# Altium PCB main_ADC_PCB.PcbDoc (part 5 of 8)
Units mm, origin at the board's own origin, x right, y up, seen from the top; angles counter-clockwise.
Board outline 150 x 100 mm, 4 copper layers (Top Layer, Layer 1, Layer 2, Bottom Layer), stack 1.62 mm thick; 535 components, 354 nets, 1725 pads, 1075 vias.
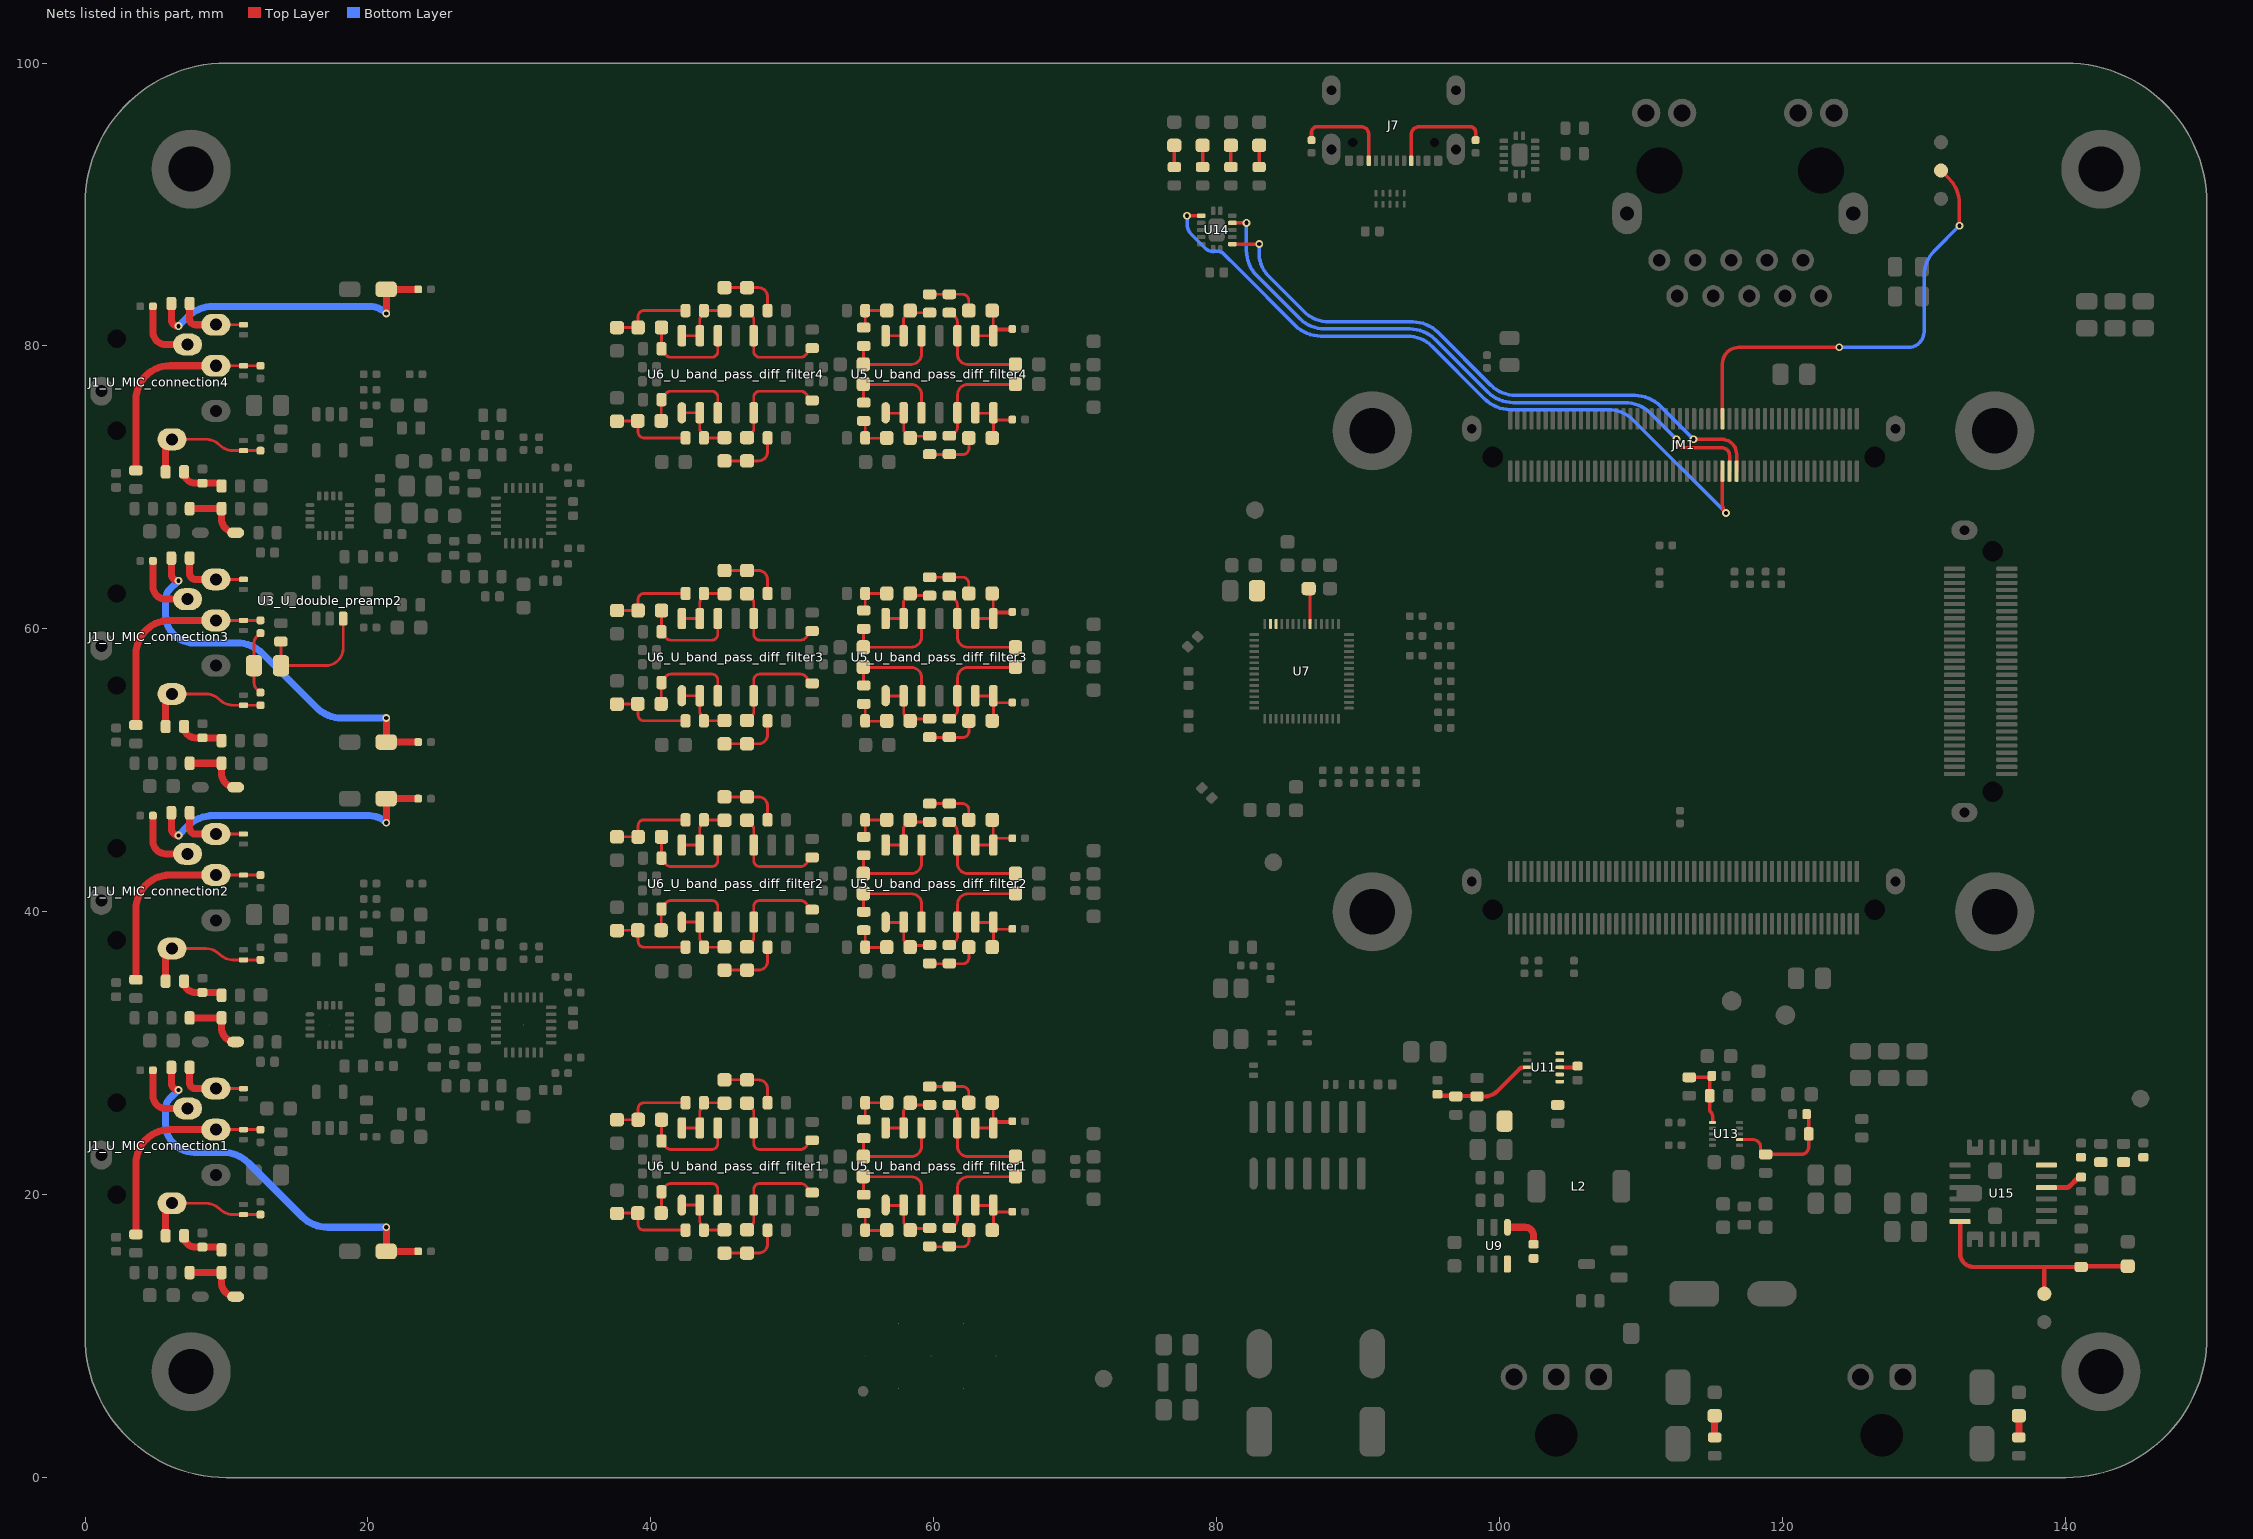
[diagram p7: the nets of this part, all layers, seen from the top]

## Via types
v1: diameter 0.55, hole 0.3, Top Layer to Bottom Layer, tented both sides, 1011 vias
v2: diameter 1, hole 0.6, Top Layer to Bottom Layer, 64 vias

## Nets (pads, with @x,y where several pads share a name; then routed paths per layer and width w, separated by ;. In a path a pad name is that pad's centre, name@x,y a point inside that pad or via, vN(x,y) a via of type N, cw(c..) or ccw(c..) an arc to the next point about the centre after c; other vN are vias at no path point) (continued)
NetC15_U_double_preamp2_1: C15_U_double_preamp2.1 R17_U_double_preamp2.2 U3_U_double_preamp2.3 | length 8.9
  Top Layer w0.2: R17_U_double_preamp2.2@13.848,59.1 13.85,59.098 C15_U_double_preamp2.1@13.85,57.4 17.016,57.4 ccw(c17.016,58.634) 18.25,58.634 U3_U_double_preamp2.3@18.25,60.725
NetC15_U_double_preamp2_2: C15_U_double_preamp2.2 R1_U_MIC_connection3.2 R2_U_MIC_connection3.2 | length 4.7
  Top Layer w0.2: R1_U_MIC_connection3.2@12.527,59.607 ccw(c12.527,59.03) 11.95,59.03 11.95,57.8 11.95,56.19 ccw(c12.564,56.19) R2_U_MIC_connection3.2@12.564,55.576
NetC20_U_band_pass_diff_filter1_1: C20_U_band_pass_diff_filter1.1 R38_U_band_pass_diff_filter1.1 R39_U_band_pass_diff_filter1.2 | length 2.8
  Top Layer w0.2: R39_U_band_pass_diff_filter1.2@55.06,18.672 55.16,18.672 55.16,17.472 C20_U_band_pass_diff_filter1.1@56.685,17.472
NetC20_U_band_pass_diff_filter1_2: C20_U_band_pass_diff_filter1.2 R36_U_band_pass_diff_filter1.2 U5_U_band_pass_diff_filter1.1 U5_U_band_pass_diff_filter1.2 | length 4.5
  Top Layer w0.2: U5_U_band_pass_diff_filter1.1@56.6,19.247 57.87,19.247 57.87,18.158 ccw(c58.441,18.158) C20_U_band_pass_diff_filter1.2@58.441,17.587 ; C20_U_band_pass_diff_filter1.2@58.441,17.622 R36_U_band_pass_diff_filter1.2@59.71,17.622
NetC20_U_band_pass_diff_filter2_1: C20_U_band_pass_diff_filter2.1 R38_U_band_pass_diff_filter2.1 R39_U_band_pass_diff_filter2.2 | length 2.8
  Top Layer w0.2: R39_U_band_pass_diff_filter2.2@55.06,38.672 55.16,38.672 55.16,37.472 C20_U_band_pass_diff_filter2.1@56.685,37.472
NetC20_U_band_pass_diff_filter2_2: C20_U_band_pass_diff_filter2.2 R36_U_band_pass_diff_filter2.2 U5_U_band_pass_diff_filter2.1 U5_U_band_pass_diff_filter2.2 | length 4.5
  Top Layer w0.2: U5_U_band_pass_diff_filter2.1@56.6,39.247 57.87,39.247 57.87,38.158 ccw(c58.441,38.158) C20_U_band_pass_diff_filter2.2@58.441,37.587 ; C20_U_band_pass_diff_filter2.2@58.441,37.622 R36_U_band_pass_diff_filter2.2@59.71,37.622
NetC20_U_band_pass_diff_filter3_1: C20_U_band_pass_diff_filter3.1 R38_U_band_pass_diff_filter3.1 R39_U_band_pass_diff_filter3.2 | length 2.8
  Top Layer w0.2: R39_U_band_pass_diff_filter3.2@55.06,54.672 55.16,54.672 55.16,53.472 C20_U_band_pass_diff_filter3.1@56.685,53.472
NetC20_U_band_pass_diff_filter3_2: C20_U_band_pass_diff_filter3.2 R36_U_band_pass_diff_filter3.2 U5_U_band_pass_diff_filter3.1 U5_U_band_pass_diff_filter3.2 | length 4.5
  Top Layer w0.2: U5_U_band_pass_diff_filter3.1@56.6,55.247 57.87,55.247 57.87,54.158 ccw(c58.441,54.158) C20_U_band_pass_diff_filter3.2@58.441,53.587 ; C20_U_band_pass_diff_filter3.2@58.441,53.622 R36_U_band_pass_diff_filter3.2@59.71,53.622
NetC20_U_band_pass_diff_filter4_1: C20_U_band_pass_diff_filter4.1 R38_U_band_pass_diff_filter4.1 R39_U_band_pass_diff_filter4.2 | length 2.8
  Top Layer w0.2: R39_U_band_pass_diff_filter4.2@55.06,74.672 55.16,74.672 55.16,73.472 C20_U_band_pass_diff_filter4.1@56.685,73.472
NetC20_U_band_pass_diff_filter4_2: C20_U_band_pass_diff_filter4.2 R36_U_band_pass_diff_filter4.2 U5_U_band_pass_diff_filter4.1 U5_U_band_pass_diff_filter4.2 | length 4.5
  Top Layer w0.2: U5_U_band_pass_diff_filter4.1@56.6,75.247 57.87,75.247 57.87,74.158 ccw(c58.441,74.158) C20_U_band_pass_diff_filter4.2@58.441,73.587 ; C20_U_band_pass_diff_filter4.2@58.441,73.622 R36_U_band_pass_diff_filter4.2@59.71,73.622
NetC21_U_band_pass_diff_filter1_1: C21_U_band_pass_diff_filter1.1 R36_U_band_pass_diff_filter1.1 R37_U_band_pass_diff_filter1.2 | length 3.7
  Top Layer w0.2: R36_U_band_pass_diff_filter1.1@59.71,16.322 60.01,16.322 61.11,16.322 62.042,16.322 ccw(c62.042,16.765) 62.485,16.765 C21_U_band_pass_diff_filter1.1@62.485,17.472
NetC21_U_band_pass_diff_filter1_2: C21_U_band_pass_diff_filter1.2 R40_U_band_pass_diff_filter1.1 U5_U_band_pass_diff_filter1.6 U5_U_band_pass_diff_filter1.7 | length 3.8
  Top Layer w0.2: U5_U_band_pass_diff_filter1.6@62.95,19.247 U5_U_band_pass_diff_filter1.7@64.22,19.247 ; C21_U_band_pass_diff_filter1.2@64.135,17.472 64.21,17.735 64.21,18.647 64.37,18.772 64.932,18.772 65.423,18.772 R40_U_band_pass_diff_filter1.1@65.56,18.772
NetC21_U_band_pass_diff_filter2_1: C21_U_band_pass_diff_filter2.1 R36_U_band_pass_diff_filter2.1 R37_U_band_pass_diff_filter2.2 | length 3.7
  Top Layer w0.2: R36_U_band_pass_diff_filter2.1@59.71,36.322 60.01,36.322 61.11,36.322 62.042,36.322 ccw(c62.042,36.765) 62.485,36.765 C21_U_band_pass_diff_filter2.1@62.485,37.472
NetC21_U_band_pass_diff_filter2_2: C21_U_band_pass_diff_filter2.2 R40_U_band_pass_diff_filter2.1 U5_U_band_pass_diff_filter2.6 U5_U_band_pass_diff_filter2.7 | length 3.8
  Top Layer w0.2: U5_U_band_pass_diff_filter2.6@62.95,39.247 U5_U_band_pass_diff_filter2.7@64.22,39.247 ; C21_U_band_pass_diff_filter2.2@64.135,37.472 64.21,37.735 64.21,38.647 64.37,38.772 64.932,38.772 65.423,38.772 R40_U_band_pass_diff_filter2.1@65.56,38.772
NetC21_U_band_pass_diff_filter3_1: C21_U_band_pass_diff_filter3.1 R36_U_band_pass_diff_filter3.1 R37_U_band_pass_diff_filter3.2 | length 3.7
  Top Layer w0.2: R36_U_band_pass_diff_filter3.1@59.71,52.322 60.01,52.322 61.11,52.322 62.042,52.322 ccw(c62.042,52.765) 62.485,52.765 C21_U_band_pass_diff_filter3.1@62.485,53.472
NetC21_U_band_pass_diff_filter3_2: C21_U_band_pass_diff_filter3.2 R40_U_band_pass_diff_filter3.1 U5_U_band_pass_diff_filter3.6 U5_U_band_pass_diff_filter3.7 | length 3.8
  Top Layer w0.2: U5_U_band_pass_diff_filter3.6@62.95,55.247 U5_U_band_pass_diff_filter3.7@64.22,55.247 ; C21_U_band_pass_diff_filter3.2@64.135,53.472 64.21,53.735 64.21,54.647 64.37,54.772 64.932,54.772 65.423,54.772 R40_U_band_pass_diff_filter3.1@65.56,54.772
NetC21_U_band_pass_diff_filter4_1: C21_U_band_pass_diff_filter4.1 R36_U_band_pass_diff_filter4.1 R37_U_band_pass_diff_filter4.2 | length 3.7
  Top Layer w0.2: R36_U_band_pass_diff_filter4.1@59.71,72.322 60.01,72.322 61.11,72.322 62.042,72.322 ccw(c62.042,72.765) 62.485,72.765 C21_U_band_pass_diff_filter4.1@62.485,73.472
NetC21_U_band_pass_diff_filter4_2: C21_U_band_pass_diff_filter4.2 R40_U_band_pass_diff_filter4.1 U5_U_band_pass_diff_filter4.6 U5_U_band_pass_diff_filter4.7 | length 3.8
  Top Layer w0.2: U5_U_band_pass_diff_filter4.6@62.95,75.247 U5_U_band_pass_diff_filter4.7@64.22,75.247 ; C21_U_band_pass_diff_filter4.2@64.135,73.472 64.21,73.735 64.21,74.647 64.37,74.772 64.932,74.772 65.423,74.772 R40_U_band_pass_diff_filter4.1@65.56,74.772
NetC22_U_band_pass_diff_filter1_1: C22_U_band_pass_diff_filter1.1 C23_U_band_pass_diff_filter1.2 R34_U_band_pass_diff_filter1.2 | length 4.4
  Top Layer w0.2: C22_U_band_pass_diff_filter1.1@45.2,15.875 C23_U_band_pass_diff_filter1.2@46.8,15.875 47.6,15.875 ccw(c47.6,16.525) 48.25,16.525 R34_U_band_pass_diff_filter1.2@48.25,17.5
NetC22_U_band_pass_diff_filter1_2: C22_U_band_pass_diff_filter1.2 R35_U_band_pass_diff_filter1.1 U6_U_band_pass_diff_filter1.1 U6_U_band_pass_diff_filter1.2 | length 4.5
  Top Layer w0.2: U6_U_band_pass_diff_filter1.1@42.19,19.275 U6_U_band_pass_diff_filter1.2@43.46,19.275 43.46,18.186 ccw(c44.27,18.186) R35_U_band_pass_diff_filter1.1@43.697,17.613 ; R35_U_band_pass_diff_filter1.1@43.75,17.5 45.175,17.5 ccw(c45.175,17.525) C22_U_band_pass_diff_filter1.2@45.2,17.525
NetC22_U_band_pass_diff_filter2_1: C22_U_band_pass_diff_filter2.1 C23_U_band_pass_diff_filter2.2 R34_U_band_pass_diff_filter2.2 | length 4.4
  Top Layer w0.2: C22_U_band_pass_diff_filter2.1@45.2,35.875 C23_U_band_pass_diff_filter2.2@46.8,35.875 47.6,35.875 ccw(c47.6,36.525) 48.25,36.525 R34_U_band_pass_diff_filter2.2@48.25,37.5
NetC22_U_band_pass_diff_filter2_2: C22_U_band_pass_diff_filter2.2 R35_U_band_pass_diff_filter2.1 U6_U_band_pass_diff_filter2.1 U6_U_band_pass_diff_filter2.2 | length 4.5
  Top Layer w0.2: U6_U_band_pass_diff_filter2.1@42.19,39.275 U6_U_band_pass_diff_filter2.2@43.46,39.275 43.46,38.186 ccw(c44.27,38.186) R35_U_band_pass_diff_filter2.1@43.697,37.613 ; R35_U_band_pass_diff_filter2.1@43.75,37.5 45.175,37.5 ccw(c45.175,37.525) C22_U_band_pass_diff_filter2.2@45.2,37.525
NetC22_U_band_pass_diff_filter3_1: C22_U_band_pass_diff_filter3.1 C23_U_band_pass_diff_filter3.2 R34_U_band_pass_diff_filter3.2 | length 4.4
  Top Layer w0.2: C22_U_band_pass_diff_filter3.1@45.2,51.875 C23_U_band_pass_diff_filter3.2@46.8,51.875 47.6,51.875 ccw(c47.6,52.525) 48.25,52.525 R34_U_band_pass_diff_filter3.2@48.25,53.5
NetC22_U_band_pass_diff_filter3_2: C22_U_band_pass_diff_filter3.2 R35_U_band_pass_diff_filter3.1 U6_U_band_pass_diff_filter3.1 U6_U_band_pass_diff_filter3.2 | length 4.5
  Top Layer w0.2: U6_U_band_pass_diff_filter3.1@42.19,55.275 U6_U_band_pass_diff_filter3.2@43.46,55.275 43.46,54.186 ccw(c44.27,54.186) R35_U_band_pass_diff_filter3.1@43.697,53.613 ; R35_U_band_pass_diff_filter3.1@43.75,53.5 45.175,53.5 ccw(c45.175,53.525) C22_U_band_pass_diff_filter3.2@45.2,53.525
NetC22_U_band_pass_diff_filter4_1: C22_U_band_pass_diff_filter4.1 C23_U_band_pass_diff_filter4.2 R34_U_band_pass_diff_filter4.2 | length 4.4
  Top Layer w0.2: C22_U_band_pass_diff_filter4.1@45.2,71.875 C23_U_band_pass_diff_filter4.2@46.8,71.875 47.6,71.875 ccw(c47.6,72.525) 48.25,72.525 R34_U_band_pass_diff_filter4.2@48.25,73.5
NetC22_U_band_pass_diff_filter4_2: C22_U_band_pass_diff_filter4.2 R35_U_band_pass_diff_filter4.1 U6_U_band_pass_diff_filter4.1 U6_U_band_pass_diff_filter4.2 | length 4.5
  Top Layer w0.2: U6_U_band_pass_diff_filter4.1@42.19,75.275 U6_U_band_pass_diff_filter4.2@43.46,75.275 43.46,74.186 ccw(c44.27,74.186) R35_U_band_pass_diff_filter4.1@43.697,73.613 ; R35_U_band_pass_diff_filter4.1@43.75,73.5 45.175,73.5 ccw(c45.175,73.525) C22_U_band_pass_diff_filter4.2@45.2,73.525
NetC23_U_band_pass_diff_filter1_1: C23_U_band_pass_diff_filter1.1 R41_U_band_pass_diff_filter1.1 U6_U_band_pass_diff_filter1.5 | length 7.1
  Top Layer w0.2: C23_U_band_pass_diff_filter1.1@46.94,17.786 ccw(c46.94,18.116) 47.27,18.116 U6_U_band_pass_diff_filter1.5@47.27,19.275 47.27,20.37 cw(c47.7,20.37) 47.7,20.8 50.569,20.8 cw(c50.569,20.28) R41_U_band_pass_diff_filter1.1@51.089,20.28
NetC23_U_band_pass_diff_filter2_1: C23_U_band_pass_diff_filter2.1 R41_U_band_pass_diff_filter2.1 U6_U_band_pass_diff_filter2.5 | length 7.1
  Top Layer w0.2: C23_U_band_pass_diff_filter2.1@46.94,37.786 ccw(c46.94,38.116) 47.27,38.116 U6_U_band_pass_diff_filter2.5@47.27,39.275 47.27,40.37 cw(c47.7,40.37) 47.7,40.8 50.569,40.8 cw(c50.569,40.28) R41_U_band_pass_diff_filter2.1@51.089,40.28
NetC23_U_band_pass_diff_filter3_1: C23_U_band_pass_diff_filter3.1 R41_U_band_pass_diff_filter3.1 U6_U_band_pass_diff_filter3.5 | length 7.1
  Top Layer w0.2: C23_U_band_pass_diff_filter3.1@46.94,53.786 ccw(c46.94,54.116) 47.27,54.116 U6_U_band_pass_diff_filter3.5@47.27,55.275 47.27,56.37 cw(c47.7,56.37) 47.7,56.8 50.569,56.8 cw(c50.569,56.28) R41_U_band_pass_diff_filter3.1@51.089,56.28
NetC23_U_band_pass_diff_filter4_1: C23_U_band_pass_diff_filter4.1 R41_U_band_pass_diff_filter4.1 U6_U_band_pass_diff_filter4.5 | length 7.1
  Top Layer w0.2: C23_U_band_pass_diff_filter4.1@46.94,73.786 ccw(c46.94,74.116) 47.27,74.116 U6_U_band_pass_diff_filter4.5@47.27,75.275 47.27,76.37 cw(c47.7,76.37) 47.7,76.8 50.569,76.8 cw(c50.569,76.28) R41_U_band_pass_diff_filter4.1@51.089,76.28
NetC24_U_band_pass_diff_filter1_1: C24_U_band_pass_diff_filter1.1 C25_U_band_pass_diff_filter1.2 R35_U_band_pass_diff_filter1.2 | length 5.9
  Top Layer w0.2: C24_U_band_pass_diff_filter1.1@37.6,18.7 39.1,18.7 39.1,17.9 ccw(c39.5,17.9) 39.5,17.5 R35_U_band_pass_diff_filter1.2@42.45,17.5
NetC24_U_band_pass_diff_filter2_1: C24_U_band_pass_diff_filter2.1 C25_U_band_pass_diff_filter2.2 R35_U_band_pass_diff_filter2.2 | length 5.9
  Top Layer w0.2: C24_U_band_pass_diff_filter2.1@37.6,38.7 39.1,38.7 39.1,37.9 ccw(c39.5,37.9) 39.5,37.5 R35_U_band_pass_diff_filter2.2@42.45,37.5
NetC24_U_band_pass_diff_filter3_1: C24_U_band_pass_diff_filter3.1 C25_U_band_pass_diff_filter3.2 R35_U_band_pass_diff_filter3.2 | length 5.9
  Top Layer w0.2: C24_U_band_pass_diff_filter3.1@37.6,54.7 39.1,54.7 39.1,53.9 ccw(c39.5,53.9) 39.5,53.5 R35_U_band_pass_diff_filter3.2@42.45,53.5
NetC24_U_band_pass_diff_filter4_1: C24_U_band_pass_diff_filter4.1 C25_U_band_pass_diff_filter4.2 R35_U_band_pass_diff_filter4.2 | length 5.9
  Top Layer w0.2: C24_U_band_pass_diff_filter4.1@37.6,74.7 39.1,74.7 39.1,73.9 ccw(c39.5,73.9) 39.5,73.5 R35_U_band_pass_diff_filter4.2@42.45,73.5
NetC25_U_band_pass_diff_filter1_1: C25_U_band_pass_diff_filter1.1 R42_U_band_pass_diff_filter1.1 U6_U_band_pass_diff_filter1.3 | length 7
  Top Layer w0.2: C25_U_band_pass_diff_filter1.1@40.75,18.7 R42_U_band_pass_diff_filter1.1@40.75,20.2 ; R42_U_band_pass_diff_filter1.1@40.911,20.28 cw(c41.431,20.28) 41.431,20.8 44.3,20.8 cw(c44.3,20.37) 44.73,20.37 U6_U_band_pass_diff_filter1.3@44.73,19.275
NetC25_U_band_pass_diff_filter2_1: C25_U_band_pass_diff_filter2.1 R42_U_band_pass_diff_filter2.1 U6_U_band_pass_diff_filter2.3 | length 7
  Top Layer w0.2: C25_U_band_pass_diff_filter2.1@40.725,38.7 40.738,38.713 40.738,40.187 R42_U_band_pass_diff_filter2.1@40.75,40.2 ; R42_U_band_pass_diff_filter2.1@40.911,40.28 cw(c41.431,40.28) 41.431,40.8 44.3,40.8 cw(c44.3,40.37) 44.73,40.37 U6_U_band_pass_diff_filter2.3@44.73,39.275
NetC25_U_band_pass_diff_filter3_1: C25_U_band_pass_diff_filter3.1 R42_U_band_pass_diff_filter3.1 U6_U_band_pass_diff_filter3.3 | length 7
  Top Layer w0.2: C25_U_band_pass_diff_filter3.1@40.725,54.7 40.738,54.713 40.738,56.187 R42_U_band_pass_diff_filter3.1@40.75,56.2 ; R42_U_band_pass_diff_filter3.1@40.911,56.28 cw(c41.431,56.28) 41.431,56.8 44.3,56.8 cw(c44.3,56.37) 44.73,56.37 U6_U_band_pass_diff_filter3.3@44.73,55.275
NetC25_U_band_pass_diff_filter4_1: C25_U_band_pass_diff_filter4.1 R42_U_band_pass_diff_filter4.1 U6_U_band_pass_diff_filter4.3 | length 7
  Top Layer w0.2: C25_U_band_pass_diff_filter4.1@40.725,74.7 40.738,74.713 40.738,76.187 R42_U_band_pass_diff_filter4.1@40.75,76.2 ; R42_U_band_pass_diff_filter4.1@40.911,76.28 cw(c41.431,76.28) 41.431,76.8 44.3,76.8 cw(c44.3,76.37) 44.73,76.37 U6_U_band_pass_diff_filter4.3@44.73,75.275
NetC27_U_band_pass_diff_filter1_1: C27_U_band_pass_diff_filter1.1 R37_U_band_pass_diff_filter1.1 U5_U_band_pass_diff_filter1.5 | length 7.6
  Top Layer w0.2: R37_U_band_pass_diff_filter1.1@61.13,17.745 ccw(c61.13,18.295) 61.68,18.295 61.68,19.247 61.68,20.542 cw(c62.41,20.542) 62.41,21.272 C27_U_band_pass_diff_filter1.1@65.785,21.272
NetC27_U_band_pass_diff_filter2_1: C27_U_band_pass_diff_filter2.1 R37_U_band_pass_diff_filter2.1 U5_U_band_pass_diff_filter2.5 | length 7.6
  Top Layer w0.2: R37_U_band_pass_diff_filter2.1@61.13,37.745 ccw(c61.13,38.295) 61.68,38.295 61.68,39.247 61.68,40.542 cw(c62.41,40.542) 62.41,41.272 C27_U_band_pass_diff_filter2.1@65.785,41.272
NetC27_U_band_pass_diff_filter3_1: C27_U_band_pass_diff_filter3.1 R37_U_band_pass_diff_filter3.1 U5_U_band_pass_diff_filter3.5 | length 7.6
  Top Layer w0.2: R37_U_band_pass_diff_filter3.1@61.13,53.745 ccw(c61.13,54.295) 61.68,54.295 61.68,55.247 61.68,56.542 cw(c62.41,56.542) 62.41,57.272 C27_U_band_pass_diff_filter3.1@65.785,57.272
NetC27_U_band_pass_diff_filter4_1: C27_U_band_pass_diff_filter4.1 R37_U_band_pass_diff_filter4.1 U5_U_band_pass_diff_filter4.5 | length 7.6
  Top Layer w0.2: R37_U_band_pass_diff_filter4.1@61.13,73.745 ccw(c61.13,74.295) 61.68,74.295 61.68,75.247 61.68,76.542 cw(c62.41,76.542) 62.41,77.272 C27_U_band_pass_diff_filter4.1@65.785,77.272
NetC28_U_band_pass_diff_filter1_1: C28_U_band_pass_diff_filter1.1 R39_U_band_pass_diff_filter1.1 U5_U_band_pass_diff_filter1.3 | length 7.1
  Top Layer w0.2: C28_U_band_pass_diff_filter1.1@55.035,21.272 58.41,21.272 cw(c58.41,20.542) 59.14,20.542 U5_U_band_pass_diff_filter1.3@59.14,19.247 ; R39_U_band_pass_diff_filter1.1@55.037,20.012 C28_U_band_pass_diff_filter1.1@55.037,21.27
NetC28_U_band_pass_diff_filter2_1: C28_U_band_pass_diff_filter2.1 R39_U_band_pass_diff_filter2.1 U5_U_band_pass_diff_filter2.3 | length 7.1
  Top Layer w0.2: C28_U_band_pass_diff_filter2.1@55.035,41.272 58.41,41.272 cw(c58.41,40.542) 59.14,40.542 U5_U_band_pass_diff_filter2.3@59.14,39.247 ; R39_U_band_pass_diff_filter2.1@55.037,40.012 C28_U_band_pass_diff_filter2.1@55.037,41.27
NetC28_U_band_pass_diff_filter3_1: C28_U_band_pass_diff_filter3.1 R39_U_band_pass_diff_filter3.1 U5_U_band_pass_diff_filter3.3 | length 7.1
  Top Layer w0.2: R39_U_band_pass_diff_filter3.1@55.05,56 55.037,56.012 55.037,57.27 55.035,57.272 58.41,57.272 cw(c58.41,56.542) 59.14,56.542 U5_U_band_pass_diff_filter3.3@59.14,55.247
NetC28_U_band_pass_diff_filter4_1: C28_U_band_pass_diff_filter4.1 R39_U_band_pass_diff_filter4.1 U5_U_band_pass_diff_filter4.3 | length 7.1
  Top Layer w0.2: C28_U_band_pass_diff_filter4.1@55.035,77.272 58.41,77.272 cw(c58.41,76.542) 59.14,76.542 U5_U_band_pass_diff_filter4.3@59.14,75.247 ; R39_U_band_pass_diff_filter4.1@55.037,76.012 C28_U_band_pass_diff_filter4.1@55.037,77.27
NetC31_U_band_pass_diff_filter1_1: C31_U_band_pass_diff_filter1.1 R47_U_band_pass_diff_filter1.1 R48_U_band_pass_diff_filter1.2 | length 2.8
  Top Layer w0.2: R48_U_band_pass_diff_filter1.2@55.05,25.3 55.15,25.3 R47_U_band_pass_diff_filter1.1@55.15,26.5 C31_U_band_pass_diff_filter1.1@56.675,26.5
NetC31_U_band_pass_diff_filter1_2: C31_U_band_pass_diff_filter1.2 R45_U_band_pass_diff_filter1.2 U5_U_band_pass_diff_filter1.13 U5_U_band_pass_diff_filter1.14 | length 4.5
  Top Layer w0.2: U5_U_band_pass_diff_filter1.14@56.59,24.725 U5_U_band_pass_diff_filter1.13@57.86,24.725 57.86,25.814 cw(c58.431,25.814) C31_U_band_pass_diff_filter1.2@58.431,26.386 ; C31_U_band_pass_diff_filter1.2@58.431,26.35 R45_U_band_pass_diff_filter1.2@59.7,26.35
NetC31_U_band_pass_diff_filter2_1: C31_U_band_pass_diff_filter2.1 R47_U_band_pass_diff_filter2.1 R48_U_band_pass_diff_filter2.2 | length 2.8
  Top Layer w0.2: R48_U_band_pass_diff_filter2.2@55.05,45.3 55.15,45.3 R47_U_band_pass_diff_filter2.1@55.15,46.5 C31_U_band_pass_diff_filter2.1@56.675,46.5
NetC31_U_band_pass_diff_filter2_2: C31_U_band_pass_diff_filter2.2 R45_U_band_pass_diff_filter2.2 U5_U_band_pass_diff_filter2.13 U5_U_band_pass_diff_filter2.14 | length 4.5
  Top Layer w0.2: U5_U_band_pass_diff_filter2.14@56.59,44.725 U5_U_band_pass_diff_filter2.13@57.86,44.725 57.86,45.814 cw(c58.431,45.814) C31_U_band_pass_diff_filter2.2@58.431,46.386 ; C31_U_band_pass_diff_filter2.2@58.431,46.35 R45_U_band_pass_diff_filter2.2@59.7,46.35
NetC31_U_band_pass_diff_filter3_1: C31_U_band_pass_diff_filter3.1 R47_U_band_pass_diff_filter3.1 R48_U_band_pass_diff_filter3.2 | length 2.8
  Top Layer w0.2: R48_U_band_pass_diff_filter3.2@55.05,61.3 55.15,61.3 R47_U_band_pass_diff_filter3.1@55.15,62.5 C31_U_band_pass_diff_filter3.1@56.675,62.5
NetC31_U_band_pass_diff_filter3_2: C31_U_band_pass_diff_filter3.2 R45_U_band_pass_diff_filter3.2 U5_U_band_pass_diff_filter3.13 U5_U_band_pass_diff_filter3.14 | length 4.5
  Top Layer w0.2: U5_U_band_pass_diff_filter3.14@56.59,60.725 U5_U_band_pass_diff_filter3.13@57.86,60.725 57.86,61.814 cw(c58.431,61.814) C31_U_band_pass_diff_filter3.2@58.431,62.386 ; C31_U_band_pass_diff_filter3.2@58.431,62.35 R45_U_band_pass_diff_filter3.2@59.7,62.35
NetC31_U_band_pass_diff_filter4_1: C31_U_band_pass_diff_filter4.1 R47_U_band_pass_diff_filter4.1 R48_U_band_pass_diff_filter4.2 | length 2.8
  Top Layer w0.2: R48_U_band_pass_diff_filter4.2@55.05,81.3 55.15,81.3 R47_U_band_pass_diff_filter4.1@55.15,82.5 C31_U_band_pass_diff_filter4.1@56.675,82.5
NetC31_U_band_pass_diff_filter4_2: C31_U_band_pass_diff_filter4.2 R45_U_band_pass_diff_filter4.2 U5_U_band_pass_diff_filter4.13 U5_U_band_pass_diff_filter4.14 | length 4.5
  Top Layer w0.2: U5_U_band_pass_diff_filter4.14@56.59,80.725 U5_U_band_pass_diff_filter4.13@57.86,80.725 57.86,81.814 cw(c58.431,81.814) C31_U_band_pass_diff_filter4.2@58.431,82.386 ; C31_U_band_pass_diff_filter4.2@58.431,82.35 R45_U_band_pass_diff_filter4.2@59.7,82.35
NetC32_U_band_pass_diff_filter1_1: C32_U_band_pass_diff_filter1.1 R45_U_band_pass_diff_filter1.1 R46_U_band_pass_diff_filter1.2 | length 3.7
  Top Layer w0.2: R45_U_band_pass_diff_filter1.1@59.7,27.65 60,27.65 R46_U_band_pass_diff_filter1.2@61.1,27.65 62.032,27.65 cw(c62.032,27.207) 62.475,27.207 C32_U_band_pass_diff_filter1.1@62.475,26.5
NetC32_U_band_pass_diff_filter1_2: C32_U_band_pass_diff_filter1.2 R49_U_band_pass_diff_filter1.1 U5_U_band_pass_diff_filter1.8 U5_U_band_pass_diff_filter1.9 | length 5
  Top Layer w0.2: U5_U_band_pass_diff_filter1.9@62.94,24.725 U5_U_band_pass_diff_filter1.8@64.21,24.725 ; C32_U_band_pass_diff_filter1.2@64.125,26.5 64.2,26.237 64.2,25.325 64.36,25.2 64.922,25.2 65.412,25.2 R49_U_band_pass_diff_filter1.1@65.55,25.2 ; U5_U_band_pass_diff_filter1.8@64.319,25.116 R49_U_band_pass_diff_filter1.1@65.465,25.116
NetC32_U_band_pass_diff_filter2_1: C32_U_band_pass_diff_filter2.1 R45_U_band_pass_diff_filter2.1 R46_U_band_pass_diff_filter2.2 | length 3.7
  Top Layer w0.2: R45_U_band_pass_diff_filter2.1@59.7,47.65 60,47.65 R46_U_band_pass_diff_filter2.2@61.1,47.65 62.032,47.65 cw(c62.032,47.207) 62.475,47.207 C32_U_band_pass_diff_filter2.1@62.475,46.5
NetC32_U_band_pass_diff_filter2_2: C32_U_band_pass_diff_filter2.2 R49_U_band_pass_diff_filter2.1 U5_U_band_pass_diff_filter2.8 U5_U_band_pass_diff_filter2.9 | length 3.8
  Top Layer w0.2: U5_U_band_pass_diff_filter2.9@62.94,44.725 U5_U_band_pass_diff_filter2.8@64.21,44.725 ; C32_U_band_pass_diff_filter2.2@64.125,46.5 64.2,46.237 64.2,45.325 64.36,45.2 64.922,45.2 65.412,45.2 R49_U_band_pass_diff_filter2.1@65.55,45.2
NetC32_U_band_pass_diff_filter3_1: C32_U_band_pass_diff_filter3.1 R45_U_band_pass_diff_filter3.1 R46_U_band_pass_diff_filter3.2 | length 3.7
  Top Layer w0.2: R45_U_band_pass_diff_filter3.1@59.7,63.65 60,63.65 R46_U_band_pass_diff_filter3.2@61.1,63.65 62.032,63.65 cw(c62.032,63.207) 62.475,63.207 C32_U_band_pass_diff_filter3.1@62.475,62.5
NetC32_U_band_pass_diff_filter3_2: C32_U_band_pass_diff_filter3.2 R49_U_band_pass_diff_filter3.1 U5_U_band_pass_diff_filter3.8 U5_U_band_pass_diff_filter3.9 | length 5.5
  Top Layer w0.2: U5_U_band_pass_diff_filter3.9@62.94,60.725 U5_U_band_pass_diff_filter3.8@64.21,60.725 64.319,61.116 65.465,61.116 R49_U_band_pass_diff_filter3.1@65.55,61.2 65.412,61.2 64.922,61.2 64.36,61.2 64.2,61.325 64.2,62.237 C32_U_band_pass_diff_filter3.2@64.125,62.5
NetC32_U_band_pass_diff_filter4_1: C32_U_band_pass_diff_filter4.1 R45_U_band_pass_diff_filter4.1 R46_U_band_pass_diff_filter4.2 | length 3.7
  Top Layer w0.2: R45_U_band_pass_diff_filter4.1@59.7,83.65 60,83.65 R46_U_band_pass_diff_filter4.2@61.1,83.65 62.032,83.65 cw(c62.032,83.207) 62.475,83.207 C32_U_band_pass_diff_filter4.1@62.475,82.5
NetC32_U_band_pass_diff_filter4_2: C32_U_band_pass_diff_filter4.2 R49_U_band_pass_diff_filter4.1 U5_U_band_pass_diff_filter4.8 U5_U_band_pass_diff_filter4.9 | length 5
  Top Layer w0.2: U5_U_band_pass_diff_filter4.9@62.94,80.725 U5_U_band_pass_diff_filter4.8@64.21,80.725 ; C32_U_band_pass_diff_filter4.2@64.125,82.5 64.2,82.237 64.2,81.325 64.36,81.2 64.922,81.2 65.412,81.2 R49_U_band_pass_diff_filter4.1@65.55,81.2 ; U5_U_band_pass_diff_filter4.8@64.319,81.116 R49_U_band_pass_diff_filter4.1@65.465,81.116
NetC34_U_band_pass_diff_filter1_1: C34_U_band_pass_diff_filter1.1 C35_U_band_pass_diff_filter1.2 R43_U_band_pass_diff_filter1.2 | length 4.4
  Top Layer w0.2: C34_U_band_pass_diff_filter1.1@45.2,28.125 C35_U_band_pass_diff_filter1.2@46.8,28.125 47.6,28.125 cw(c47.6,27.475) 48.25,27.475 R43_U_band_pass_diff_filter1.2@48.25,26.5
NetC34_U_band_pass_diff_filter1_2: C34_U_band_pass_diff_filter1.2 R44_U_band_pass_diff_filter1.1 U6_U_band_pass_diff_filter1.13 U6_U_band_pass_diff_filter1.14 | length 4.5
  Top Layer w0.2: U6_U_band_pass_diff_filter1.14@42.19,24.725 U6_U_band_pass_diff_filter1.13@43.46,24.725 43.46,25.814 cw(c44.27,25.814) R44_U_band_pass_diff_filter1.1@43.697,26.387 ; R44_U_band_pass_diff_filter1.1@43.75,26.5 45.175,26.5 cw(c45.175,26.475) C34_U_band_pass_diff_filter1.2@45.2,26.475
NetC34_U_band_pass_diff_filter2_1: C34_U_band_pass_diff_filter2.1 C35_U_band_pass_diff_filter2.2 R43_U_band_pass_diff_filter2.2 | length 4.4
  Top Layer w0.2: C34_U_band_pass_diff_filter2.1@45.2,48.125 C35_U_band_pass_diff_filter2.2@46.8,48.125 47.6,48.125 cw(c47.6,47.475) 48.25,47.475 R43_U_band_pass_diff_filter2.2@48.25,46.5
NetC34_U_band_pass_diff_filter2_2: C34_U_band_pass_diff_filter2.2 R44_U_band_pass_diff_filter2.1 U6_U_band_pass_diff_filter2.13 U6_U_band_pass_diff_filter2.14 | length 4.5
  Top Layer w0.2: U6_U_band_pass_diff_filter2.14@42.19,44.725 U6_U_band_pass_diff_filter2.13@43.46,44.725 43.46,45.814 cw(c44.27,45.814) R44_U_band_pass_diff_filter2.1@43.697,46.387 ; R44_U_band_pass_diff_filter2.1@43.75,46.5 45.175,46.5 cw(c45.175,46.475) C34_U_band_pass_diff_filter2.2@45.2,46.475
NetC34_U_band_pass_diff_filter3_1: C34_U_band_pass_diff_filter3.1 C35_U_band_pass_diff_filter3.2 R43_U_band_pass_diff_filter3.2 | length 4.4
  Top Layer w0.2: C34_U_band_pass_diff_filter3.1@45.2,64.125 C35_U_band_pass_diff_filter3.2@46.8,64.125 47.6,64.125 cw(c47.6,63.475) 48.25,63.475 R43_U_band_pass_diff_filter3.2@48.25,62.5
NetC34_U_band_pass_diff_filter3_2: C34_U_band_pass_diff_filter3.2 R44_U_band_pass_diff_filter3.1 U6_U_band_pass_diff_filter3.13 U6_U_band_pass_diff_filter3.14 | length 4.5
  Top Layer w0.2: U6_U_band_pass_diff_filter3.14@42.19,60.725 U6_U_band_pass_diff_filter3.13@43.46,60.725 43.46,61.814 cw(c44.27,61.814) R44_U_band_pass_diff_filter3.1@43.697,62.387 ; R44_U_band_pass_diff_filter3.1@43.75,62.5 45.175,62.5 cw(c45.175,62.475) C34_U_band_pass_diff_filter3.2@45.2,62.475
NetC34_U_band_pass_diff_filter4_1: C34_U_band_pass_diff_filter4.1 C35_U_band_pass_diff_filter4.2 R43_U_band_pass_diff_filter4.2 | length 4.4
  Top Layer w0.2: C34_U_band_pass_diff_filter4.1@45.2,84.125 C35_U_band_pass_diff_filter4.2@46.8,84.125 47.6,84.125 cw(c47.6,83.475) 48.25,83.475 R43_U_band_pass_diff_filter4.2@48.25,82.5
NetC34_U_band_pass_diff_filter4_2: C34_U_band_pass_diff_filter4.2 R44_U_band_pass_diff_filter4.1 U6_U_band_pass_diff_filter4.13 U6_U_band_pass_diff_filter4.14 | length 4.5
  Top Layer w0.2: U6_U_band_pass_diff_filter4.14@42.19,80.725 U6_U_band_pass_diff_filter4.13@43.46,80.725 43.46,81.814 cw(c44.27,81.814) R44_U_band_pass_diff_filter4.1@43.697,82.387 ; R44_U_band_pass_diff_filter4.1@43.75,82.5 45.175,82.5 cw(c45.175,82.475) C34_U_band_pass_diff_filter4.2@45.2,82.475
NetC35_U_band_pass_diff_filter1_1: C35_U_band_pass_diff_filter1.1 R50_U_band_pass_diff_filter1.1 U6_U_band_pass_diff_filter1.10 | length 7.1
  Top Layer w0.2: C35_U_band_pass_diff_filter1.1@46.94,26.214 cw(c46.94,25.884) 47.27,25.884 U6_U_band_pass_diff_filter1.10@47.27,24.725 47.27,23.63 ccw(c47.7,23.63) 47.7,23.2 50.569,23.2 ccw(c50.569,23.72) R50_U_band_pass_diff_filter1.1@51.089,23.72
NetC35_U_band_pass_diff_filter2_1: C35_U_band_pass_diff_filter2.1 R50_U_band_pass_diff_filter2.1 U6_U_band_pass_diff_filter2.10 | length 7.1
  Top Layer w0.2: C35_U_band_pass_diff_filter2.1@46.94,46.214 cw(c46.94,45.884) 47.27,45.884 U6_U_band_pass_diff_filter2.10@47.27,44.725 47.27,43.63 ccw(c47.7,43.63) 47.7,43.2 50.569,43.2 ccw(c50.569,43.72) R50_U_band_pass_diff_filter2.1@51.089,43.72
NetC35_U_band_pass_diff_filter3_1: C35_U_band_pass_diff_filter3.1 R50_U_band_pass_diff_filter3.1 U6_U_band_pass_diff_filter3.10 | length 7.1
  Top Layer w0.2: C35_U_band_pass_diff_filter3.1@46.94,62.214 cw(c46.94,61.884) 47.27,61.884 U6_U_band_pass_diff_filter3.10@47.27,60.725 47.27,59.63 ccw(c47.7,59.63) 47.7,59.2 50.569,59.2 ccw(c50.569,59.72) R50_U_band_pass_diff_filter3.1@51.089,59.72
NetC35_U_band_pass_diff_filter4_1: C35_U_band_pass_diff_filter4.1 R50_U_band_pass_diff_filter4.1 U6_U_band_pass_diff_filter4.10 | length 7.1
  Top Layer w0.2: C35_U_band_pass_diff_filter4.1@46.94,82.214 cw(c46.94,81.884) 47.27,81.884 U6_U_band_pass_diff_filter4.10@47.27,80.725 47.27,79.63 ccw(c47.7,79.63) 47.7,79.2 50.569,79.2 ccw(c50.569,79.72) R50_U_band_pass_diff_filter4.1@51.089,79.72
NetC36_U_band_pass_diff_filter1_1: C36_U_band_pass_diff_filter1.1 C37_U_band_pass_diff_filter1.2 R44_U_band_pass_diff_filter1.2 | length 5.9
  Top Layer w0.2: C36_U_band_pass_diff_filter1.1@37.6,25.3 C37_U_band_pass_diff_filter1.2@39.1,25.3 39.1,26.1 cw(c39.5,26.1) 39.5,26.5 R44_U_band_pass_diff_filter1.2@42.45,26.5
NetC36_U_band_pass_diff_filter2_1: C36_U_band_pass_diff_filter2.1 C37_U_band_pass_diff_filter2.2 R44_U_band_pass_diff_filter2.2 | length 5.9
  Top Layer w0.2: C36_U_band_pass_diff_filter2.1@37.6,45.3 C37_U_band_pass_diff_filter2.2@39.1,45.3 39.1,46.1 cw(c39.5,46.1) 39.5,46.5 R44_U_band_pass_diff_filter2.2@42.45,46.5
NetC36_U_band_pass_diff_filter3_1: C36_U_band_pass_diff_filter3.1 C37_U_band_pass_diff_filter3.2 R44_U_band_pass_diff_filter3.2 | length 5.9
  Top Layer w0.2: C36_U_band_pass_diff_filter3.1@37.6,61.3 C37_U_band_pass_diff_filter3.2@39.1,61.3 39.1,62.1 cw(c39.5,62.1) 39.5,62.5 R44_U_band_pass_diff_filter3.2@42.45,62.5
NetC36_U_band_pass_diff_filter4_1: C36_U_band_pass_diff_filter4.1 C37_U_band_pass_diff_filter4.2 R44_U_band_pass_diff_filter4.2 | length 5.9
  Top Layer w0.2: C36_U_band_pass_diff_filter4.1@37.6,81.3 C37_U_band_pass_diff_filter4.2@39.1,81.3 39.1,82.1 cw(c39.5,82.1) 39.5,82.5 R44_U_band_pass_diff_filter4.2@42.45,82.5
NetC37_U_band_pass_diff_filter1_1: C37_U_band_pass_diff_filter1.1 R51_U_band_pass_diff_filter1.1 U6_U_band_pass_diff_filter1.12 | length 7
  Top Layer w0.2: R51_U_band_pass_diff_filter1.1@40.75,23.8 C37_U_band_pass_diff_filter1.1@40.75,25.3 ; R51_U_band_pass_diff_filter1.1@40.911,23.72 ccw(c41.431,23.72) 41.431,23.2 44.3,23.2 ccw(c44.3,23.63) 44.73,23.63 U6_U_band_pass_diff_filter1.12@44.73,24.725
NetC37_U_band_pass_diff_filter2_1: C37_U_band_pass_diff_filter2.1 R51_U_band_pass_diff_filter2.1 U6_U_band_pass_diff_filter2.12 | length 7
  Top Layer w0.2: R51_U_band_pass_diff_filter2.1@40.75,43.8 C37_U_band_pass_diff_filter2.1@40.75,45.3 ; R51_U_band_pass_diff_filter2.1@40.911,43.72 ccw(c41.431,43.72) 41.431,43.2 44.3,43.2 ccw(c44.3,43.63) 44.73,43.63 U6_U_band_pass_diff_filter2.12@44.73,44.725
NetC37_U_band_pass_diff_filter3_1: C37_U_band_pass_diff_filter3.1 R51_U_band_pass_diff_filter3.1 U6_U_band_pass_diff_filter3.12 | length 7
  Top Layer w0.2: R51_U_band_pass_diff_filter3.1@40.75,59.8 C37_U_band_pass_diff_filter3.1@40.75,61.3 ; R51_U_band_pass_diff_filter3.1@40.911,59.72 ccw(c41.431,59.72) 41.431,59.2 44.3,59.2 ccw(c44.3,59.63) 44.73,59.63 U6_U_band_pass_diff_filter3.12@44.73,60.725
NetC37_U_band_pass_diff_filter4_1: C37_U_band_pass_diff_filter4.1 R51_U_band_pass_diff_filter4.1 U6_U_band_pass_diff_filter4.12 | length 7
  Top Layer w0.2: R51_U_band_pass_diff_filter4.1@40.75,79.8 C37_U_band_pass_diff_filter4.1@40.75,81.3 ; R51_U_band_pass_diff_filter4.1@40.911,79.72 ccw(c41.431,79.72) 41.431,79.2 44.3,79.2 ccw(c44.3,79.63) 44.73,79.63 U6_U_band_pass_diff_filter4.12@44.73,80.725
NetC39_U_band_pass_diff_filter1_1: C39_U_band_pass_diff_filter1.1 R46_U_band_pass_diff_filter1.1 U5_U_band_pass_diff_filter1.10 | length 7.6
  Top Layer w0.2: R46_U_band_pass_diff_filter1.1@61.12,26.227 cw(c61.12,25.677) 61.67,25.677 U5_U_band_pass_diff_filter1.10@61.67,24.725 61.67,23.43 ccw(c62.4,23.43) 62.4,22.7 C39_U_band_pass_diff_filter1.1@65.775,22.7
NetC39_U_band_pass_diff_filter2_1: C39_U_band_pass_diff_filter2.1 R46_U_band_pass_diff_filter2.1 U5_U_band_pass_diff_filter2.10 | length 7.6
  Top Layer w0.2: R46_U_band_pass_diff_filter2.1@61.12,46.227 cw(c61.12,45.677) 61.67,45.677 U5_U_band_pass_diff_filter2.10@61.67,44.725 61.67,43.43 ccw(c62.4,43.43) 62.4,42.7 C39_U_band_pass_diff_filter2.1@65.775,42.7
NetC39_U_band_pass_diff_filter3_1: C39_U_band_pass_diff_filter3.1 R46_U_band_pass_diff_filter3.1 U5_U_band_pass_diff_filter3.10 | length 7.6
  Top Layer w0.2: R46_U_band_pass_diff_filter3.1@61.12,62.227 cw(c61.12,61.677) 61.67,61.677 U5_U_band_pass_diff_filter3.10@61.67,60.725 61.67,59.43 ccw(c62.4,59.43) 62.4,58.7 C39_U_band_pass_diff_filter3.1@65.775,58.7
NetC39_U_band_pass_diff_filter4_1: C39_U_band_pass_diff_filter4.1 R46_U_band_pass_diff_filter4.1 U5_U_band_pass_diff_filter4.10 | length 7.6
  Top Layer w0.2: R46_U_band_pass_diff_filter4.1@61.12,82.227 cw(c61.12,81.677) 61.67,81.677 U5_U_band_pass_diff_filter4.10@61.67,80.725 61.67,79.43 ccw(c62.4,79.43) 62.4,78.7 C39_U_band_pass_diff_filter4.1@65.775,78.7
NetC40_U_band_pass_diff_filter1_1: C40_U_band_pass_diff_filter1.1 R48_U_band_pass_diff_filter1.1 U5_U_band_pass_diff_filter1.12 | length 7.1
  Top Layer w0.2: C40_U_band_pass_diff_filter1.1@55.025,22.7 58.4,22.7 ccw(c58.4,23.43) 59.13,23.43 U5_U_band_pass_diff_filter1.12@59.13,24.725 ; C40_U_band_pass_diff_filter1.1@55.037,22.712 R48_U_band_pass_diff_filter1.1@55.037,23.987
NetC40_U_band_pass_diff_filter2_1: C40_U_band_pass_diff_filter2.1 R48_U_band_pass_diff_filter2.1 U5_U_band_pass_diff_filter2.12 | length 7.1
  Top Layer w0.2: C40_U_band_pass_diff_filter2.1@55.025,42.7 58.4,42.7 ccw(c58.4,43.43) 59.13,43.43 U5_U_band_pass_diff_filter2.12@59.13,44.725 ; C40_U_band_pass_diff_filter2.1@55.037,42.712 R48_U_band_pass_diff_filter2.1@55.037,43.987
NetC40_U_band_pass_diff_filter3_1: C40_U_band_pass_diff_filter3.1 R48_U_band_pass_diff_filter3.1 U5_U_band_pass_diff_filter3.12 | length 7.1
  Top Layer w0.2: R48_U_band_pass_diff_filter3.1@55.05,60 55.037,59.988 55.037,58.712 C40_U_band_pass_diff_filter3.1@55.025,58.7 58.4,58.7 ccw(c58.4,59.43) 59.13,59.43 U5_U_band_pass_diff_filter3.12@59.13,60.725
NetC40_U_band_pass_diff_filter4_1: C40_U_band_pass_diff_filter4.1 R48_U_band_pass_diff_filter4.1 U5_U_band_pass_diff_filter4.12 | length 7.1
  Top Layer w0.2: C40_U_band_pass_diff_filter4.1@55.025,78.7 58.4,78.7 ccw(c58.4,79.43) 59.13,79.43 U5_U_band_pass_diff_filter4.12@59.13,80.725 ; C40_U_band_pass_diff_filter4.1@55.037,78.712 R48_U_band_pass_diff_filter4.1@55.037,79.987
NetC46_U_MIC_connection1_1: C46_U_MIC_connection1.1 R5_U_MIC_connection1.2 R53_U_MIC_connection1.2 | length 3.2
  Top Layer w0.5: R5_U_MIC_connection1.2@7,17.1 ccw(c7.8,17.1) 7.8,16.3 C46_U_MIC_connection1.1@8.3,16.3 9.45,16.3 cw(c9.45,16.1) R53_U_MIC_connection1.2@9.65,16.1
NetC46_U_MIC_connection2_1: C46_U_MIC_connection2.1 R5_U_MIC_connection2.2 R53_U_MIC_connection2.2 | length 3.2
  Top Layer w0.5: R5_U_MIC_connection2.2@7,35.1 ccw(c7.8,35.1) 7.8,34.3 C46_U_MIC_connection2.1@8.3,34.3 9.45,34.3 cw(c9.45,34.1) R53_U_MIC_connection2.2@9.65,34.1
NetC46_U_MIC_connection3_1: C46_U_MIC_connection3.1 R5_U_MIC_connection3.2 R53_U_MIC_connection3.2 | length 3.2
  Top Layer w0.5: R5_U_MIC_connection3.2@7,53.1 ccw(c7.8,53.1) 7.8,52.3 C46_U_MIC_connection3.1@8.3,52.3 9.45,52.3 cw(c9.45,52.1) R53_U_MIC_connection3.2@9.65,52.1
NetC46_U_MIC_connection4_1: C46_U_MIC_connection4.1 R5_U_MIC_connection4.2 R53_U_MIC_connection4.2 | length 3.2
  Top Layer w0.5: R5_U_MIC_connection4.2@7,71.1 ccw(c7.8,71.1) 7.8,70.3 C46_U_MIC_connection4.1@8.3,70.3 9.45,70.3 cw(c9.45,70.1) R53_U_MIC_connection4.2@9.65,70.1
NetC50_1: C50.1 U7.26 U7.27
NetC51_1: C51.1 U7.20 | length 2.5
  Top Layer w0.2: U7.20@86.6,60.35 C51.1@86.6,62.85
NetC57_1: C57.1 U9.1 | length 2.8
  Top Layer w0.5: U9.1@100.55,17.7 101.8,17.7 cw(c101.8,17.1) 102.4,17.1 C57.1@102.4,16.5
NetC57_2: C57.2 L2.2 U9.6
NetC62_2: C62.2 F2.1 U11.6 U11.7 U11.9 U11.10
NetC63_2: C63.2 R84.2 R85.1 U11.3 | length 6.9
  Top Layer w0.3: C63.2@95.6,27 95.805,26.992 96.6,26.992 R85.1@96.9,26.95 97.2,26.983 98.1,26.983 R84.2@98.398,26.992 ; R84.2@98.4,26.95 98.955,26.95 ccw(c98.955,28.145) 99.8,27.3 101.359,28.859 cw(c101.7,28.517) U11.3@101.7,29
NetC65_1: C65.1 U11.8 | length 1.3
  Top Layer w0.3: U11.8@104.25,29 105.259,29 ccw(c105.259,29.341) C65.1@105.5,29.1
NetC87_1: C87.1 C88.2 R112.2 R113.1 U15.26
NetC89_1: C89.1 R114.1 U15.13 VCC.1 | length 16.6
  Top Layer w0.3: U15.13@132.55,18.1 132.55,15.85 ccw(c133.5,15.85) 133.5,14.9 138.5,14.9 ; VCC.1@138.5,13 138.5,14.9 ; C89.1@144.4,14.95 141.221,14.95 ccw(c141.221,14.779) R114.1@141.1,14.9 138.5,14.9
NetC90_1: C90.1 U15.24 | length 2.7
  Top Layer w0.35: U15.24@138.65,20.5 140,20.5 ccw(c140,20.983) 140.341,20.641 140.844,21.144 cw(c141.1,20.888) C90.1@141.1,21.25
NetC96_2: C96.2 R92.1 R93.2 U13.1 | length 5
  Top Layer w0.245: R93.2@113.4,28.3 114.759,28.3 ccw(c114.759,28.641) C96.2@115,28.4 ccw(c115.362,28.038) 114.85,28.038 R92.1@114.85,27 114.85,26.028 ccw(c115.133,26.028) 114.933,25.829 cw(c114.65,25.546) 115.05,25.546 U13.1@115.05,25.165
NetC97_2: C97.2 R94.2 R95.2 U13.7 | length 7.9
  Top Layer w0.22: U13.7@116.95,23.9 117.9,23.9 cw(c117.9,23.351) 118.449,23.351 R95.2@118.449,23.023
  Top Layer w0.245: R95.2@118.8,22.85 121.3,22.85 ccw(c121.3,23.4) 121.85,23.4 R94.2@121.85,24.3 121.85,25.55 ccw(c121.7,25.55) C97.2@121.7,25.7
NetD1_U_MIC_connection1_2: D1_U_MIC_connection1.2 R3_U_MIC_connection1.2 R52_U_MIC_connection1.1 | length 4.5
  Top Layer w0.5: R3_U_MIC_connection1.2@7.4,14.5 R52_U_MIC_connection1.1@9.65,14.5 9.65,13.8 ccw(c10.65,13.8) D1_U_MIC_connection1.2@10.65,12.8
NetD1_U_MIC_connection2_2: D1_U_MIC_connection2.2 R3_U_MIC_connection2.2 R52_U_MIC_connection2.1 | length 4.5
  Top Layer w0.5: R3_U_MIC_connection2.2@7.4,32.5 R52_U_MIC_connection2.1@9.65,32.5 9.65,31.8 ccw(c10.65,31.8) D1_U_MIC_connection2.2@10.65,30.8
NetD1_U_MIC_connection3_2: D1_U_MIC_connection3.2 R3_U_MIC_connection3.2 R52_U_MIC_connection3.1 | length 4.5
  Top Layer w0.5: R3_U_MIC_connection3.2@7.4,50.5 R52_U_MIC_connection3.1@9.65,50.5 9.65,49.8 ccw(c10.65,49.8) D1_U_MIC_connection3.2@10.65,48.8
NetD1_U_MIC_connection4_2: D1_U_MIC_connection4.2 R3_U_MIC_connection4.2 R52_U_MIC_connection4.1 | length 4.5
  Top Layer w0.5: R3_U_MIC_connection4.2@7.4,68.5 R52_U_MIC_connection4.1@9.65,68.5 9.65,67.8 ccw(c10.65,67.8) D1_U_MIC_connection4.2@10.65,66.8
NetD2_U_MIC_connection1_2: D2_U_MIC_connection1.2 J1_U_MIC_connection1.6 R119.2 | length 5.1
  Top Layer w0.2: J1_U_MIC_connection1.6@9.25,27.5 D2_U_MIC_connection1.2@11.2,27.5
  Top Layer w0.5: R119.2@7.4,29 7.4,27.9 ccw(c7.8,27.9) 7.8,27.5 J1_U_MIC_connection1.6@9.25,27.5
NetD2_U_MIC_connection2_2: D2_U_MIC_connection2.2 J1_U_MIC_connection2.6 R117.2 | length 5.1
  Top Layer w0.2: J1_U_MIC_connection2.6@9.25,45.5 D2_U_MIC_connection2.2@11.2,45.5
  Top Layer w0.5: R117.2@7.4,47 7.4,45.9 ccw(c7.8,45.9) 7.8,45.5 J1_U_MIC_connection2.6@9.25,45.5
NetD2_U_MIC_connection3_2: D2_U_MIC_connection3.2 J1_U_MIC_connection3.6 R78.2 | length 5.1
  Top Layer w0.2: J1_U_MIC_connection3.6@9.25,63.5 D2_U_MIC_connection3.2@11.2,63.5
  Top Layer w0.5: R78.2@7.4,65 7.4,63.9 ccw(c7.8,63.9) 7.8,63.5 J1_U_MIC_connection3.6@9.25,63.5
NetD2_U_MIC_connection4_2: D2_U_MIC_connection4.2 J1_U_MIC_connection4.6 R76.2 | length 5.1
  Top Layer w0.2: J1_U_MIC_connection4.6@9.25,81.5 D2_U_MIC_connection4.2@11.2,81.5
  Top Layer w0.5: R76.2@7.4,83 7.4,81.9 ccw(c7.8,81.9) 7.8,81.5 J1_U_MIC_connection4.6@9.25,81.5
NetD3_U_MIC_connection1_2: D3_U_MIC_connection1.2 J1_U_MIC_connection1.3 R2_U_MIC_connection1.1 R5_U_MIC_connection1.1 | length 9
  Top Layer w0.2: J1_U_MIC_connection1.3@6.15,19.4 8.546,19.4 cw(c8.546,18.046) 9.503,19.003 ccw(c10.477,19.977) 10.477,18.6 ; 10.478,18.6 D3_U_MIC_connection1.2@11.2,18.6 R2_U_MIC_connection1.1@12.4,18.6
  Top Layer w0.5: R5_U_MIC_connection1.1@5.7,17.1 5.7,18.95 cw(c6.15,18.95) J1_U_MIC_connection1.3@6.15,19.4
NetD3_U_MIC_connection2_2: D3_U_MIC_connection2.2 J1_U_MIC_connection2.3 R2_U_MIC_connection2.1 R5_U_MIC_connection2.1 | length 9
  Top Layer w0.2: J1_U_MIC_connection2.3@6.15,37.4 8.546,37.4 cw(c8.546,36.046) 9.503,37.003 ccw(c10.477,37.977) 10.477,36.6 ; 10.478,36.6 D3_U_MIC_connection2.2@11.2,36.6 R2_U_MIC_connection2.1@12.4,36.6
  Top Layer w0.5: R5_U_MIC_connection2.1@5.7,35.1 5.7,36.95 cw(c6.15,36.95) J1_U_MIC_connection2.3@6.15,37.4
NetD3_U_MIC_connection3_2: D3_U_MIC_connection3.2 J1_U_MIC_connection3.3 R2_U_MIC_connection3.1 R5_U_MIC_connection3.1 | length 9
  Top Layer w0.2: J1_U_MIC_connection3.3@6.15,55.4 8.546,55.4 cw(c8.546,54.046) 9.503,55.003 ccw(c10.477,55.977) 10.477,54.6 ; 10.478,54.6 D3_U_MIC_connection3.2@11.2,54.6 R2_U_MIC_connection3.1@12.4,54.6
  Top Layer w0.5: R5_U_MIC_connection3.1@5.7,53.1 5.7,54.95 cw(c6.15,54.95) J1_U_MIC_connection3.3@6.15,55.4
NetD3_U_MIC_connection4_2: D3_U_MIC_connection4.2 J1_U_MIC_connection4.3 R2_U_MIC_connection4.1 R5_U_MIC_connection4.1 | length 9
  Top Layer w0.2: J1_U_MIC_connection4.3@6.15,73.4 8.546,73.4 cw(c8.546,72.046) 9.503,73.003 ccw(c10.477,73.977) 10.477,72.6 ; 10.478,72.6 D3_U_MIC_connection4.2@11.2,72.6 R2_U_MIC_connection4.1@12.4,72.6
  Top Layer w0.5: R5_U_MIC_connection4.1@5.7,71.1 5.7,72.95 cw(c6.15,72.95) J1_U_MIC_connection4.3@6.15,73.4
NetD4_U_MIC_connection1_2: D4_U_MIC_connection1.2 J1_U_MIC_connection1.2 R1_U_MIC_connection1.1 R54_U_MIC_connection1.1 | length 15.2
  Top Layer w0.2: J1_U_MIC_connection1.2@9.25,24.6 D4_U_MIC_connection1.2@11.2,24.6 R1_U_MIC_connection1.1@12.4,24.6
  Top Layer w0.5: R54_U_MIC_connection1.1@3.6,17.2 3.6,22.2 cw(c6,22.2) 6,24.6 J1_U_MIC_connection1.2@9.25,24.6
NetD4_U_MIC_connection2_2: D4_U_MIC_connection2.2 J1_U_MIC_connection2.2 R1_U_MIC_connection2.1 R54_U_MIC_connection2.1 | length 15.2
  Top Layer w0.2: J1_U_MIC_connection2.2@9.25,42.6 D4_U_MIC_connection2.2@11.2,42.6 R1_U_MIC_connection2.1@12.4,42.6
  Top Layer w0.5: R54_U_MIC_connection2.1@3.6,35.2 3.6,40.2 cw(c6,40.2) 6,42.6 J1_U_MIC_connection2.2@9.25,42.6
NetD4_U_MIC_connection3_2: D4_U_MIC_connection3.2 J1_U_MIC_connection3.2 R1_U_MIC_connection3.1 R54_U_MIC_connection3.1 | length 15.2
  Top Layer w0.2: J1_U_MIC_connection3.2@9.25,60.6 D4_U_MIC_connection3.2@11.2,60.6 R1_U_MIC_connection3.1@12.4,60.6
  Top Layer w0.5: R54_U_MIC_connection3.1@3.6,53.2 3.6,58.2 cw(c6,58.2) 6,60.6 J1_U_MIC_connection3.2@9.25,60.6
NetD4_U_MIC_connection4_2: D4_U_MIC_connection4.2 J1_U_MIC_connection4.2 R1_U_MIC_connection4.1 R54_U_MIC_connection4.1 | length 15.2
  Top Layer w0.2: J1_U_MIC_connection4.2@9.25,78.6 D4_U_MIC_connection4.2@11.2,78.6 R1_U_MIC_connection4.1@12.4,78.6
  Top Layer w0.5: R54_U_MIC_connection4.1@3.6,71.2 3.6,76.2 cw(c6,76.2) 6,78.6 J1_U_MIC_connection4.2@9.25,78.6
NetD5_2: D5.2 R76.1 R77.2 | length 21.2
  Top Layer w0.5: R76.1@6.1,83 6.1,81.9 ccw(c6.6,81.9) v1(6.6,81.4) ; v1(21.3,82.3) 21.3,83.976 ccw(c21.266,83.976) D5.2@21.29,84 R77.2@23.55,84
  Bottom Layer w0.5: v1(6.6,81.4) 7.256,82.056 cw(c9.052,80.26) 9.052,82.8 20.093,82.8 cw(c20.093,81.093) v1(21.3,82.3)
NetD7_2: D7.2 R122.1 | length 1.5
  Top Layer w0.5: R122.1@115.2,2.85 D7.2@115.2,4.375
NetD16_2: D16.2 R91.1 | length 1.5
  Top Layer w0.5: R91.1@136.7,2.85 D16.2@136.7,4.375
NetD17_1: D17.1 R98.1 | length 1.5
  Top Layer w0.25: R98.1@83,92.65 D17.1@83,94.175
NetD18_1: D18.1 R99.1 | length 1.5
  Top Layer w0.25: R99.1@81,92.65 D18.1@81,94.175
NetD19_1: D19.1 R100.1 | length 1.5
  Top Layer w0.25: R100.1@79,92.65 D19.1@79,94.175
NetD20_1: D20.1 R101.1 | length 1.5
  Top Layer w0.25: R101.1@77,92.65 D20.1@77,94.175
NetD21_2: D21.2 R78.1 R79.2 | length 27.3
  Top Layer w0.5: R78.1@6.1,65 6.1,63.9 ccw(c6.6,63.9) v1(6.6,63.4) ; v1(21.3,53.7) 21.3,52.024 cw(c21.266,52.024) D21.2@21.29,52 R79.2@23.55,52
  Bottom Layer w0.5: v1(6.6,63.4) 5.983,62.783 ccw(c6.666,62.1) 5.7,62.1 5.7,61 ccw(c7.7,61) 7.7,59 10.748,59 cw(c10.748,56.46) 12.544,58.256 16.356,54.444 ccw(c18.152,56.24) 18.152,53.7 v1(21.3,53.7)
NetD22_2: D22.2 R117.1 R118.2 | length 21.2
  Top Layer w0.5: R117.1@6.1,47 6.1,45.9 ccw(c6.6,45.9) v1(6.6,45.4) ; v1(21.3,46.3) 21.3,47.976 ccw(c21.266,47.976) D22.2@21.29,48 R118.2@23.55,48
  Bottom Layer w0.5: v1(6.6,45.4) 7.256,46.056 cw(c9.052,44.26) 9.052,46.8 20.093,46.8 cw(c20.093,45.093) v1(21.3,46.3)
NetD23_2: D23.2 R119.1 R120.2 | length 27.3
  Top Layer w0.5: R119.1@6.1,29 6.1,27.9 ccw(c6.6,27.9) v1(6.6,27.4) ; v1(21.3,17.7) 21.3,16.024 cw(c21.266,16.024) D23.2@21.29,16 R120.2@23.55,16
  Bottom Layer w0.5: v1(6.6,27.4) 5.983,26.783 ccw(c6.666,26.1) 5.7,26.1 5.7,25 ccw(c7.7,25) 7.7,23 9.748,23 cw(c9.748,20.46) 11.544,22.256 15.356,18.444 ccw(c17.152,20.24) 17.152,17.7 v1(21.3,17.7)
NetJ1_U_MIC_connection1_5: J1_U_MIC_connection1.5 R6_U_MIC_connection1.1 | length 4.8
  Top Layer w0.5: R6_U_MIC_connection1.1@4.8,28.8 4.8,27 ccw(c5.7,27) 5.7,26.1 J1_U_MIC_connection1.5@7.25,26.1
NetJ1_U_MIC_connection2_5: J1_U_MIC_connection2.5 R6_U_MIC_connection2.1 | length 4.8
  Top Layer w0.5: R6_U_MIC_connection2.1@4.8,46.8 4.8,45 ccw(c5.7,45) 5.7,44.1 J1_U_MIC_connection2.5@7.25,44.1
NetJ1_U_MIC_connection3_5: J1_U_MIC_connection3.5 R6_U_MIC_connection3.1 | length 4.8
  Top Layer w0.5: R6_U_MIC_connection3.1@4.8,64.8 4.8,63 ccw(c5.7,63) 5.7,62.1 J1_U_MIC_connection3.5@7.25,62.1
NetJ1_U_MIC_connection4_5: J1_U_MIC_connection4.5 R6_U_MIC_connection4.1 | length 4.8
  Top Layer w0.5: R6_U_MIC_connection4.1@4.8,82.8 4.8,81 ccw(c5.7,81) 5.7,80.1 J1_U_MIC_connection4.5@7.25,80.1
NetJ7_A5: J7.A5 R89.1 | length 7.5
  Top Layer w0.25: J7.A5@93.75,93.1 93.75,94.95 cw(c94.3,94.95) 94.3,95.5 97.9,95.5 cw(c97.9,95.1) 98.3,95.1 R89.1@98.3,94.55
NetJ7_B5: J7.B5 R90.1 | length 7
  Top Layer w0.25: R90.1@86.7,94.55 86.7,95.1 cw(c87.1,95.1) 87.1,95.5 90.2,95.5 cw(c90.2,94.95) 90.75,94.95 J7.B5@90.75,93.1
NetJM1_35: JM1.35 U14.2 | length 43.6
  Top Layer w0.25: U14.2@81.1,87.2 v1(83,87.2) ; v1(113.7,73.4) 115.7,73.4 cw(c115.7,72.35) 116.75,72.35 JM1.35@116.75,71.15
  Bottom Layer w0.25: v1(83,87.2) 83,86.552 ccw(c85.299,86.552) 83.673,84.927 86.156,82.444 ccw(c87.952,84.24) 87.952,81.7 93.848,81.7 cw(c93.848,79.16) 95.644,80.956 99.356,77.244 ccw(c101.152,79.04) 101.152,76.5 109.548,76.5 cw(c109.548,73.96) 111.344,75.756 v1(113.7,73.4)
NetJM1_37: JM1.37 U14.5 | length 44.5
  Top Layer w0.25: U14.5@81.1,88.7 v1(82.1,88.7) ; v1(112.5,73.4) ccw(c113.1,73.4) 113.1,72.8 115.7,72.8 cw(c115.7,72.25) 116.25,72.25 JM1.37@116.25,71.15
  Bottom Layer w0.25: v1(82.1,88.7) 82.1,86.752 ccw(c84.64,86.752) 82.844,84.956 85.856,81.944 ccw(c87.652,83.74) 87.652,81.2 93.648,81.2 cw(c93.648,78.66) 95.444,80.456 99.156,76.744 ccw(c100.952,78.54) 100.952,76 108.848,76 cw(c108.848,73.46) 110.644,75.256 v1(112.5,73.4)
NetJM1_39: JM1.39 U14.9 | length 50.9
  Top Layer w0.25: v1(77.9,89.2) U14.9@78.9,89.2 ; JM1.39@115.75,71.15 115.75,68.804 ccw(c116.604,68.804) v1(116,68.2)
  Bottom Layer w0.25: v1(77.9,89.2) 77.9,88.624 ccw(c78.924,88.624) 78.2,87.9 79.188,86.912 ccw(c79.7,87.424) 79.7,86.7 80.017,86.7 cw(c80.017,86.017) 80.5,86.5 81.482,85.518 ; 81.481,85.519 81.482,85.518 ; v1(116,68.2) 109.444,74.756 ccw(c107.648,72.96) 107.648,75.5 100.752,75.5 cw(c100.752,78.04) 98.956,76.244 95.244,79.956 ccw(c93.448,78.16) 93.448,80.7 87.352,80.7 cw(c87.352,83.24) 85.556,81.444 81.482,85.518
NetJM1_40: JM1.40 PWR_M2.1 | length 32.2
  Top Layer w0.245: JM1.40@115.75,74.85 115.75,78.75 cw(c116.9,78.75) 116.9,79.9 v1(124,79.9) ; PWR_M2.1@131.2,92.4 131.756,91.844 cw(c129.96,90.048) 132.5,90.048 v1(132.5,88.5)
  Bottom Layer w0.245: v1(124,79.9) 128.9,79.9 ccw(c128.9,81) 130,81 130,84.948 cw(c132.54,84.948) 130.744,86.744 v1(132.5,88.5)